# Altium PCB HFPB_01-PCB.PcbDoc (part 4 of 5)
Units mm, origin at the board's own origin, x right, y up, seen from the top; angles counter-clockwise.
Board outline 125 x 200 mm, 8 copper layers (Top Layer, Signal Layer 1, Signal Layer 2, Signal Layer 3, Signal Layer 4, Signal Layer 5, Signal Layer 6, Bottom Layer), stack 1.53 mm thick; 382 components, 179 nets, 1080 pads, 272 vias.
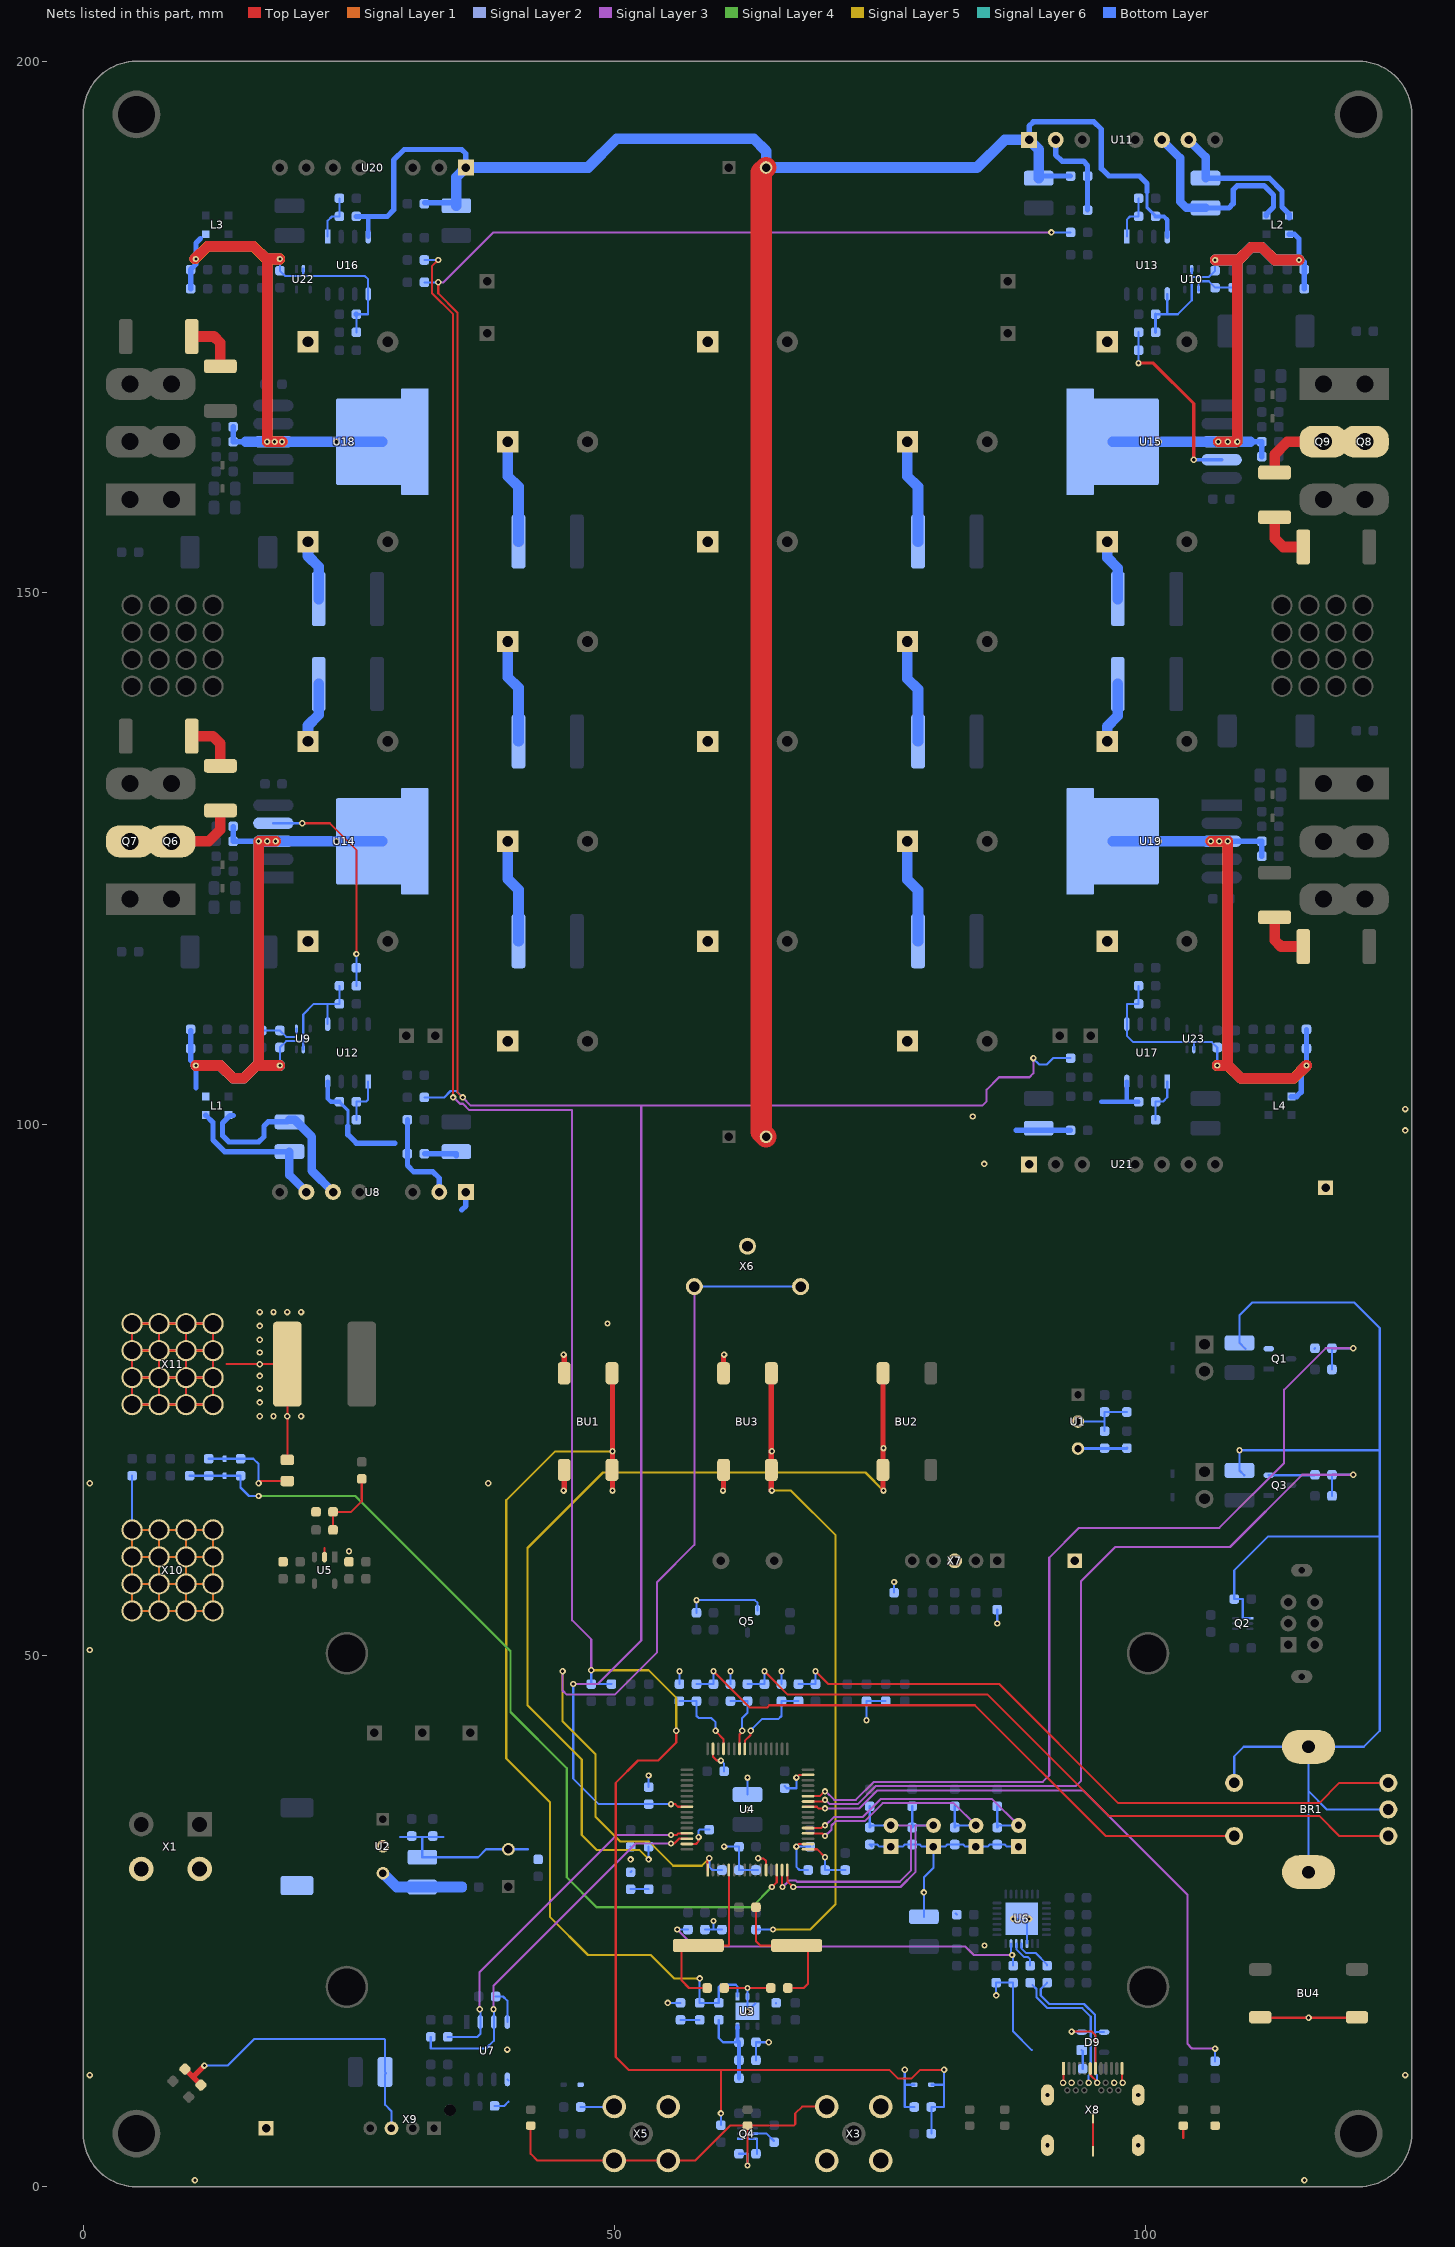
[diagram p9: the nets of this part, all layers, seen from the top]

## Via types
v1: diameter 0.6, hole 0.3, Top Layer to Bottom Layer, tented both sides, 272 vias

## Nets (pads, with @x,y where several pads share a name; then routed paths per layer and width w, separated by ;. In a path a pad name is that pad's centre, name@x,y a point inside that pad or via, vN(x,y) a via of type N, cw(c..) or ccw(c..) an arc to the next point about the centre after c; other vN are vias at no path point) (continued)
+HV: C50.P C51.P C52.P C53.P C54.P C55.P C56.P C57.P C58.P C59.P C60.P C61.P C62.P C63.P C64.P C65.P C66.P C67.P C68.P C69.P C70.1 C71.1 C72.1 C73.1 C74.1 C75.1 C76.1 C77.1 C78.1 C79.1 C96.1 C97.1 Q6.2 Q7.2 Q8.2 Q9.2 R1.2 X10.1 | length 466.9
  Top Layer w1: Q6.2@8.3,126.6 11.8,126.6 12.9,127.7 C96.1@12.9,129.5 ; C97.1@112.1,161.3 112.1,163 113.3,164.2 116,164.2 Q9.2@116.7,163.5
  Signal Layer 3 w0.2: X10.1@4.58,54.2 X10.1@4.58,61.82 ; X10.1@4.59,54.19 X10.1@12.21,54.19 ; X10.1@4.59,56.73 X10.1@7.12,56.73 ; X10.1@4.59,59.27 X10.1@7.12,59.27 ; X10.1@4.59,61.81 X10.1@7.12,61.81 ; X10.1@7.12,54.2 X10.1@7.12,56.73 ; X10.1@7.12,61.82 X10.1@7.12,61.81 ; X10.1@9.66,54.2 X10.1@9.66,56.73 ; X10.1@9.66,61.82 X10.1@9.66,61.81 ; X10.1@12.2,54.2 X10.1@12.2,56.73 ; X10.1@12.2,61.82 X10.1@12.2,61.81 ; X10.1@12.21,56.73 X10.1@12.2,56.73 ; X10.1@12.21,59.27 X10.1@12.2,59.27 ; X10.1@12.21,61.81 X10.1@12.2,61.81 ; X10.1@7.12,56.73 X10.1@9.66,56.73 ; X10.1@7.12,56.73 X10.1@7.12,59.27 ; X10.1@7.12,59.27 X10.1@9.66,59.27 ; X10.1@7.12,59.27 X10.1@7.12,61.81 ; X10.1@7.12,61.81 X10.1@9.66,61.81 ; X10.1@9.66,56.73 X10.1@12.2,56.73 ; X10.1@9.66,56.73 X10.1@9.66,59.27 ; X10.1@9.66,59.27 X10.1@9.66,61.81 ; X10.1@9.66,59.27 X10.1@12.2,59.27 ; X10.1@9.66,61.81 X10.1@12.2,61.81 ; X10.1@12.2,56.73 X10.1@12.2,59.27 ; X10.1@12.2,59.27 X10.1@12.2,61.81
  Signal Layer 4 w0.2: X10.1@4.59,54.19 X10.1@4.59,61.81 ; X10.1@4.6,54.18 X10.1@12.22,54.18 ; X10.1@4.6,56.72 X10.1@7.13,56.72 ; X10.1@4.6,59.26 X10.1@7.13,59.26 ; X10.1@4.6,61.8 X10.1@7.13,61.8 ; X10.1@7.13,54.19 X10.1@7.13,56.72 ; X10.1@7.13,61.81 X10.1@7.13,61.8 ; X10.1@9.67,54.19 X10.1@9.67,56.72 ; X10.1@9.67,61.81 X10.1@9.67,61.8 ; X10.1@12.21,54.19 X10.1@12.21,56.72 ; X10.1@12.21,61.81 X10.1@12.21,61.8 ; X10.1@12.22,56.72 X10.1@12.21,56.72 ; X10.1@12.22,59.26 X10.1@12.21,59.26 ; X10.1@12.22,61.8 X10.1@12.21,61.8 ; X10.1@7.13,56.72 X10.1@9.67,56.72 ; X10.1@7.13,56.72 X10.1@7.13,59.26 ; X10.1@7.13,59.26 X10.1@9.67,59.26 ; X10.1@7.13,59.26 X10.1@7.13,61.8 ; X10.1@7.13,61.8 X10.1@9.67,61.8 ; X10.1@9.67,56.72 X10.1@9.67,59.26 ; X10.1@9.67,56.72 X10.1@12.21,56.72 ; X10.1@9.67,59.26 X10.1@9.67,61.8 ; X10.1@9.67,59.26 X10.1@12.21,59.26 ; X10.1@9.67,61.8 X10.1@12.21,61.8 ; X10.1@12.21,56.72 X10.1@12.21,59.26 ; X10.1@12.21,59.26 X10.1@12.21,61.8
  Signal Layer 1 w0.2: X10.1@4.59,56.73 X10.1@4.59,59.27 ; X10.1@4.59,56.73 X10.1@7.13,56.73 ; X10.1@4.59,56.73 X10.1@4.59,54.19 X10.1@7.13,54.19 ; X10.1@4.59,59.27 X10.1@7.13,59.27 ; X10.1@4.59,59.27 X10.1@4.59,61.81 X10.1@7.13,61.81 ; X10.1@7.13,54.19 X10.1@7.13,56.73 ; X10.1@7.13,54.19 X10.1@9.67,54.19 ; X10.1@7.13,56.73 X10.1@7.13,59.27 ; X10.1@7.13,56.73 X10.1@9.67,56.73 ; X10.1@7.13,59.27 X10.1@7.13,61.81 ; X10.1@7.13,59.27 X10.1@9.67,59.27 ; X10.1@7.13,61.81 X10.1@9.67,61.81 ; X10.1@9.67,54.19 X10.1@9.67,56.73 ; X10.1@9.67,54.19 X10.1@12.21,54.19 X10.1@12.21,56.73 ; X10.1@9.67,56.73 X10.1@9.67,59.27 ; X10.1@9.67,56.73 X10.1@12.21,56.73 ; X10.1@9.67,59.27 X10.1@9.67,61.81 ; X10.1@9.67,59.27 X10.1@12.21,59.27 ; X10.1@9.67,61.81 X10.1@12.21,61.81 X10.1@12.21,59.27 ; X10.1@12.21,56.73 X10.1@12.21,59.27
  Signal Layer 2 w0.2: X10.1@4.58,54.2 X10.1@4.58,61.82 ; X10.1@4.59,54.19 X10.1@12.21,54.19 ; X10.1@4.59,56.73 X10.1@7.12,56.73 ; X10.1@4.59,59.27 X10.1@7.12,59.27 ; X10.1@4.59,61.81 X10.1@7.12,61.81 ; X10.1@7.12,54.2 X10.1@7.12,56.73 ; X10.1@7.12,61.82 X10.1@7.12,61.81 ; X10.1@9.66,54.2 X10.1@9.66,56.73 ; X10.1@9.66,61.82 X10.1@9.66,61.81 ; X10.1@12.2,54.2 X10.1@12.2,56.73 ; X10.1@12.2,61.82 X10.1@12.2,61.81 ; X10.1@12.21,56.73 X10.1@12.2,56.73 ; X10.1@12.21,59.27 X10.1@12.2,59.27 ; X10.1@12.21,61.81 X10.1@12.2,61.81 ; X10.1@7.12,56.73 X10.1@9.66,56.73 ; X10.1@7.12,56.73 X10.1@7.12,59.27 ; X10.1@7.12,59.27 X10.1@9.66,59.27 ; X10.1@7.12,59.27 X10.1@7.12,61.81 ; X10.1@7.12,61.81 X10.1@9.66,61.81 ; X10.1@9.66,56.73 X10.1@9.66,59.27 ; X10.1@9.66,56.73 X10.1@12.2,56.73 ; X10.1@9.66,59.27 X10.1@12.2,59.27 ; X10.1@9.66,59.27 X10.1@9.66,61.81 ; X10.1@9.66,61.81 X10.1@12.2,61.81 ; X10.1@12.2,56.73 X10.1@12.2,59.27 ; X10.1@12.2,59.27 X10.1@12.2,61.81
  Signal Layer 5 w0.2: X10.1@4.58,54.2 X10.1@4.58,61.82 ; X10.1@4.59,54.19 X10.1@12.21,54.19 ; X10.1@4.59,56.73 X10.1@7.12,56.73 ; X10.1@4.59,59.27 X10.1@7.12,59.27 ; X10.1@4.59,61.81 X10.1@7.12,61.81 ; X10.1@7.12,54.2 X10.1@7.12,56.73 ; X10.1@7.12,61.82 X10.1@7.12,61.81 ; X10.1@9.66,54.2 X10.1@9.66,56.73 ; X10.1@9.66,61.82 X10.1@9.66,61.81 ; X10.1@12.2,54.2 X10.1@12.2,56.73 ; X10.1@12.2,61.82 X10.1@12.2,61.81 ; X10.1@12.21,56.73 X10.1@12.2,56.73 ; X10.1@12.21,59.27 X10.1@12.2,59.27 ; X10.1@12.21,61.81 X10.1@12.2,61.81 ; X10.1@7.12,56.73 X10.1@9.66,56.73 ; X10.1@7.12,56.73 X10.1@7.12,59.27 ; X10.1@7.12,59.27 X10.1@9.66,59.27 ; X10.1@7.12,59.27 X10.1@7.12,61.81 ; X10.1@7.12,61.81 X10.1@9.66,61.81 ; X10.1@9.66,56.73 X10.1@12.2,56.73 ; X10.1@9.66,56.73 X10.1@9.66,59.27 ; X10.1@9.66,59.27 X10.1@12.2,59.27 ; X10.1@9.66,59.27 X10.1@9.66,61.81 ; X10.1@9.66,61.81 X10.1@12.2,61.81 ; X10.1@12.2,56.73 X10.1@12.2,59.27 ; X10.1@12.2,59.27 X10.1@12.2,61.81
  Signal Layer 6 w0.2: X10.1@4.58,54.2 X10.1@4.58,61.82 ; X10.1@4.59,54.19 X10.1@12.21,54.19 ; X10.1@4.59,56.73 X10.1@7.12,56.73 ; X10.1@4.59,59.27 X10.1@7.12,59.27 ; X10.1@4.59,61.81 X10.1@7.12,61.81 ; X10.1@7.12,54.2 X10.1@7.12,56.73 ; X10.1@7.12,61.82 X10.1@7.12,61.81 ; X10.1@9.66,54.2 X10.1@9.66,56.73 ; X10.1@9.66,61.82 X10.1@9.66,61.81 ; X10.1@12.2,54.2 X10.1@12.2,56.73 ; X10.1@12.2,61.82 X10.1@12.2,61.81 ; X10.1@12.21,56.73 X10.1@12.2,56.73 ; X10.1@12.21,59.27 X10.1@12.2,59.27 ; X10.1@12.21,61.81 X10.1@12.2,61.81 ; X10.1@7.12,56.73 X10.1@9.66,56.73 ; X10.1@7.12,56.73 X10.1@7.12,59.27 ; X10.1@7.12,59.27 X10.1@9.66,59.27 ; X10.1@7.12,59.27 X10.1@7.12,61.81 ; X10.1@7.12,61.81 X10.1@9.66,61.81 ; X10.1@9.66,56.73 X10.1@9.66,59.27 ; X10.1@9.66,56.73 X10.1@12.2,56.73 ; X10.1@9.66,59.27 X10.1@9.66,61.81 ; X10.1@9.66,59.27 X10.1@12.2,59.27 ; X10.1@9.66,61.81 X10.1@12.2,61.81 ; X10.1@12.2,56.73 X10.1@12.2,59.27 ; X10.1@12.2,59.27 X10.1@12.2,61.81
  Bottom Layer w0.2: X10.1@4.59,61.81 4.6,61.82 R1.2@4.6,66.9
  Bottom Layer w1: C52.P@21.15,136 21.15,137.5 22.15,138.5 C78.1@22.15,141.4 ; C51.P@21.15,154.8 21.15,153.45 22.15,152.45 C79.1@22.15,149.4 ; C56.P@39.95,126.6 39.95,123.05 40.95,122.05 C75.1@40.95,117.2 ; C55.P@39.95,145.4 39.95,142.05 40.95,141.05 C76.1@40.95,136 ; C54.P@39.95,164.2 39.95,160.95 40.95,159.95 C77.1@40.95,154.8 ; C64.P@77.55,126.6 77.55,123 78.55,122 C72.1@78.55,117.2 ; C63.P@77.55,145.4 77.55,141.9 78.55,140.9 C73.1@78.55,136 ; C62.P@77.55,164.2 77.55,160.95 78.55,159.95 C74.1@78.55,154.8 ; C68.P@96.35,136 96.35,137.4 97.35,138.4 C70.1@97.35,141.4 ; C67.P@96.35,154.8 96.35,153.3 97.35,152.3 C71.1@97.35,149.4
+VBAT: C27.1 U4.1 X6.2 | length 89.5
  Top Layer w0.2: U4.1@58.75,29.8 58.75,30.75 v1(58.9,30.9)
  Signal Layer 3 w0.2: v1(45.1,48.5) 45.1,46.7 45.5,46.3 50,46.3 54,50.3 54,56.9 57.5,60.4 X6.2@57.5,84.7
  Signal Layer 5 w0.2: v1(45.1,48.5) 45.1,43.8 48.2,40.7 48.2,34.8 50.5,32.5 53.2,32.5 55.5,30.2 58.2,30.2 v1(58.9,30.9)
  Bottom Layer w0.2: X6.2@57.5,84.7 X6.2@67.5,84.7 ; v1(58.9,30.9) 58.9,30.1 59.2,29.8 C27.1@60.1,29.8
ADC_Current: C30.1 R43.1 U4.17 | length 5
  Top Layer w0.2: U4.17@68.2,31.75 69.05,31.75 v1(69.8,31)
  Bottom Layer w0.2: v1(69.8,31) C30.1@69.8,29.8 R43.1@71.7,29.8
ADC_HV: C13.1 D5.C R11.1 R14.2 U4.14 | length 84.2
  Top Layer w0.2: v1(64.8,28.2) 65.25,28.65 U4.14@65.25,29.8
  Signal Layer 4 w0.2: v1(16.5,65) 25.6,65 40.2,50.4 40.2,44.667 45.494,39.373 45.494,29.106 48.3,26.3 62.9,26.3 v1(64.8,28.2)
  Bottom Layer w0.2: R11.1@10,66.9 R14.2@11.8,66.9 D5.C@13.3,66.9 C13.1@14.8,66.9 14.8,65.8 15.6,65 v1(16.5,65)
ADC_NTC1: C19.1 R22.1 RT2.2 U4.15 | length 24.7
  Top Layer w0.2: U4.15@65.75,29.8 65.75,28.25 v1(65.8,28.2)
  Signal Layer 3 w0.2: v1(65.8,28.2) 66.4,28.8 67.049,28.8 67.149,28.7 76.834,28.7 77.9,29.766 77.9,34 RT2.2@76,34
  Bottom Layer w0.2: R22.1@74,35.8 C19.1@74,33.8 74.2,34 RT2.2@76,34
ADC_NTC2: C7.1 R2.1 RT1.2 U4.16 | length 24.1
  Top Layer w0.2: U4.16@66.25,29.8 66.25,28.75 v1(66.8,28.2)
  Signal Layer 3 w0.2: v1(66.8,28.2) 76.9,28.2 78.3,29.6 78.3,34 RT1.2@80,34
  Bottom Layer w0.2: R2.1@78,35.8 C7.1@78,33.8 78.2,34 RT1.2@80,34
ADC_NTC3: C43.1 R75.1 RT4.2 U4.20 | length 22.4
  Top Layer w0.2: U4.20@68.2,33.25 69.55,33.25 v1(69.8,33)
  Signal Layer 3 w0.2: v1(69.8,33) 70.4,33.6 70.4,33.986 70.814,34.4 73.531,34.4 75.231,36.1 81.9,36.1 RT4.2@84,34
  Bottom Layer w0.2: R75.1@82,35.8 C43.1@82,33.8 82.2,34 RT4.2@84,34
ADC_NTC4: C45.1 R74.1 RT3.2 U4.21 | length 26.1
  Top Layer w0.2: U4.21@68.2,33.75 69.45,33.75 69.7,34 v1(69.8,34)
  Signal Layer 3 w0.2: v1(69.8,34) 69.848,34 70.649,34.8 73.366,34.8 75.066,36.5 85.5,36.5 RT3.2@88,34
  Bottom Layer w0.2: R74.1@86,35.8 C45.1@86,33.8 86.2,34 RT3.2@88,34
Current_Sense: C124.1 R45.2 R117.2 | length 6.9
  Top Layer w0.2: R45.2@23.5,61.8 C124.1@23.5,63.5 25.2,63.5 26.2,64.5 R117.2@26.2,66.6
DANGER: R52.1 U4.25 | length 58.8
  Top Layer w0.2: U4.25@68,35.75 U4.25@68.2,35.75 69.016,35.75 69.166,35.6 v1(69.8,35.6)
  Signal Layer 3 w0.2: v1(69.8,35.6) 73.034,35.6 74.734,37.3 94.066,37.3 103.9,27.466 103.9,13.449 104.1,13.249 104.1,13.223 104.323,13 v1(106.5,13)
  Bottom Layer w0.2: R52.1@106.5,11.8 v1(106.5,13)
DP1_N: D9.2 R73.1 X8.A7 X8.B7 | length 20.9
  Top Layer w0.2: v1(93,14.6) 94.9,14.6 95.25,14.25 X8.A7@95.25,11.13
  Bottom Layer w0.2: R73.1@89.305,18.995 89.7,18.6 89.7,17.834 90.734,16.8 94,16.8 94.8,16 94.8,14.55 ; v1(93,14.6) 93,14.5 93.05,14.55 D9.2@93.945,14.55 94.8,14.55 ; X8.B7@94.6,9.78 94.6,10.46 94.8,10.66 94.8,14.55
DP1_P: D9.3 R67.1 X8.A6 X8.B6 | length 16.5
  Top Layer w0.2: X8.A6@94.75,11.13 94.75,10.514 95.4,9.864 X8.B6@95.4,9.78
  Bottom Layer w0.2: R67.1@90.7,19.2 90.1,18.6 90.1,18 90.9,17.2 94.166,17.2 95.2,16.166 95.2,14.55 ; X8.B6@95.25,9.93 X8.B6@95.4,9.78 95.4,10.46 95.2,10.66 95.2,14.55 ; D9.3@96.055,14.55 95.2,14.55
DP2_N: R73.2 U6.5 | length 2.8
  Bottom Layer w0.2: U6.5@87.8,22.875 87.8,22.334 88.534,21.6 88.9,21.6 89.1,21.4 R73.2@89.1,20.8
DP2_P: R67.2 U6.4 | length 3.6
  Bottom Layer w0.2: U6.4@88.3,22.875 88.3,22.4 88.7,22 89.6,22 90.7,20.9 R67.2@90.7,20.8
ENABLE: R55.1 R91.1 R92.1 R105.1 R106.1 U4.56 | length 285
  Top Layer w0.2: v1(33.4,179.2) 33.4,178.166 35.2,176.366 35.2,103 v1(35.7,102.5) ; v1(55.3,36) 55.7,36 55.95,35.75 U4.56@56.8,35.75
  Signal Layer 3 w0.2: v1(33.4,179.2) 33.9,179.2 38.6,183.9 v1(91.1,183.9) ; v1(35.7,102.5) 36.475,101.725 84.584,101.725 85,102.141 85,103.228 86.172,104.4 89.034,104.4 89.4,104.766 v1(89.4,106.2) ; v1(46.1,47.3) 48.4,47.3 52.5,51.4 52.5,101.7
  Bottom Layer w0.2: R91.1@32.1,102.5 33.951,102.5 34.551,103.1 35.049,103.1 35.1,103.1 v1(35.7,102.5) ; R105.1@32.1,179.2 v1(33.4,179.2) ; v1(46.1,47.3) 46.1,38.4 48.5,36 R55.1@53.2,36 v1(55.3,36) ; v1(89.4,106.2) 89.4,106.151 89.951,105.6 90.649,105.6 91.249,106.2 R106.1@92.9,106.2 ; v1(91.1,183.9) R92.1@92.9,183.9
Enc_A: C49.1 R83.2 U4.42 | length 6.4
  Top Layer w0.2: U4.42@61.75,41.2 61.75,42.55 62,42.8 v1(62,42.9)
  Bottom Layer w0.2: C49.1@60.9,45.7 R83.2@62.5,45.7 62.5,44.6 62,44.1 v1(62,42.9)
Enc_B: C48.1 R81.2 U4.41 | length 8.5
  Top Layer w0.2: U4.41@62.25,41.2 62.25,41.95 62.8,42.5 v1(62.8,42.9)
  Bottom Layer w0.2: v1(62.8,42.9) 62.9,42.9 63,43 63,43.149 63.851,44 65.4,44 65.7,44.3 C48.1@65.7,45.7 R81.2@67.3,45.7
Enc_switch: C47.1 R79.2 U4.45 | length 7.9
  Top Layer w0.2: v1(59.5,42.9) 59.5,42.851 60.25,42.101 U4.45@60.25,41.2
  Bottom Layer w0.2: C47.1@56.1,45.7 R79.2@57.7,45.7 57.7,44.3 57.9,44.1 59.1,44.1 59.5,43.7 v1(59.5,42.9)
FAN-ON-1: R8.1 R13.2 U4.27 | length 89.5
  Top Layer w0.2: U4.27@68.2,36.75 69.301,36.75 69.751,37.2 v1(69.8,37.2)
  Signal Layer 3 w0.2: v1(69.8,37.2) 69.849,37.2 70.649,36.4 72.703,36.4 74.403,38.1 90.3,38.1 90.9,38.7 90.9,59.2 93.7,62 106.9,62 113,68.1 113,75 116.9,78.9 v1(119.5,78.9)
  Bottom Layer w0.2: R8.1@117.5,76.9 R13.2@117.5,78.9 v1(119.5,78.9)
FAN-ON-2: R21.1 R28.2 U4.26 | length 79.4
  Top Layer w0.2: U4.26@68.2,36.25 69.65,36.25 v1(69.8,36.4)
  Signal Layer 3 w0.2: v1(69.8,36.4) 69.849,36.4 70.249,36 72.869,36 74.569,37.7 93.4,37.7 93.9,38.2 93.9,57 97.1,60.2 107.9,60.2 114.7,67 v1(119.5,67)
  Bottom Layer w0.2: R21.1@117.5,65 R28.2@117.5,67 v1(119.5,67)
Gen_Work: D6.C R9.1 R10.2 R12.1 R15.2 R16.1 R39.1 | length 241.5
  Top Layer w0.2: v1(33.4,181.3) 32.8,180.7 32.8,178.2 34.8,176.2 v1(34.8,102.5) ; v1(55.8,42.9) 55.8,41.8 54.1,40.1 52.2,40.1 50.1,38 50.1,12.2 51.3,11 60,11 ; v1(60,6.9) 60,11 ; v1(81,11) 78.749,11 77.949,10.2 76.651,10.2 75.851,11 60,11
  Signal Layer 3 w0.2: v1(34.8,102.5) 34.851,102.5 35.451,101.9 35.734,101.9 36.334,101.3 46,101.3 46,53.3 47.8,51.5 v1(47.8,48.6)
  Signal Layer 5 w0.2: v1(47.8,48.6) 53.2,48.6 55.8,46 v1(55.8,42.9)
  Bottom Layer w0.2: R12.1@32.1,181.3 v1(33.4,181.3) ; v1(47.8,48.6) R10.2@47.8,47.3 R9.1@49.7,47.3 ; R39.1@60,5.8 v1(60,6.9) ; R15.2@79.8,5 R16.1@79.8,7.5 81,7.5 81,9.6 ; D6.C@79.8,9.6 81,9.6 ; v1(81,11) 81,9.6
GND: BR1.0 BR1.C BR1.W BU1.1 BU1.2 BU3.1 BU3.2 BU4.1 BU4.2 C1.2 C2.2 C3.2 C4.2 C5.N C6.N C7.2 C8.2 C9.2 C10.2 C11.N C12.2 C13.2 C14.2 C15.2 C16.2 C17.2 C18.2 C19.2 C20.2 C21.2 C22.2 C23.2 C24.2 C25.2 C26.2 C27.2 C28.2 C29.2 C30.2 C31.2 C32.1 C33.2 C34.2 C35.2 C36.2 C37.1 C38.2 C39.1 C40.2 C41.2 C42.2 C43.2 C44.2 C45.2 C46.2 C47.2 C48.2 C49.2 C82.2 C85.2 C88.2 C91.2 C94.2 C95.2 C110.2 C111.2 C124.2 C127.2 C130.2 C131.2 C134.2 D2.A D5.A D6.A D8.A D9.1 LD1.C LD2.C LD3.C LD4.C Q1.2 Q2.1 Q3.2 Q4.1 Q5.2 R3.1 R13.1 R14.1 R16.2 R23.1 R28.1 R29.2 R35.2 R41.1 R44.1 R49.1 R54.1 R55.2 R62.2 R84.2 R121.1 RT1.1 RT2.1 RT3.1 RT4.1 TP4.1 TP5.1 TP6.1 U1.2 U2.2 U3.2 U3.EP U4.12 U4.18 U4.31 U4.47 U4.63 U5.2 U6.3 U6.EP U7.4 U7.5 U8.1 U11.1 U12.4 U13.4 U16.4 U17.4 U20.1 U21.1 X1.2 X1.4 X3.2 X5.2 X6.1 X7.3 X8.A1 X8.A12 X8.B1 X8.B12 X8.G1 X8.G2 X8.G3 X8.G4 X8.S1 X8.S2 X8.S3 X8.S4 X9.3 | length 600.9
  Top Layer w0.2: v1(16.5,66.2) 16.5,66.4 R121.1@19.2,66.4 ; C124.2@21.7,63.5 C124.2@21.9,63.7 ; U5.2@22.7,59.25 22.7,60.1 ; LD1.C@42.1,5.75 42.1,3.1 42.74,2.46 X5.2@49.96,2.46 X5.2@55.04,2.46 57.56,2.46 60.85,5.75 LD2.C@62.5,5.75 ; U4.63@56.8,32.25 57.65,32.25 57.9,32.5 v1(57.9,32.9) ; U4.47@59.25,41.2 59.25,40.45 59.6,40.1 v1(60,40.1) ; C41.2@60.3,18.7 C42.2@64.7,18.7 ; v1(62.5,2) LD2.C@62.5,5.75 ; v1(63.5,30.9) 64,30.9 64.25,30.65 U4.12@64.25,29.8 ; v1(67.1,32) 67.35,32.25 U4.18@68.2,32.25 ; v1(67.1,38.5) 67.149,38.5 67.399,38.75 U4.31@68.2,38.75 ; X3.2@69.96,7.54 67.64,7.54 67,6.9 67,5.9 66.85,5.75 LD2.C@62.5,5.75 ; X8.B12@92.2,9.78 92.25,9.83 X8.A1@92.25,11.13 ; X8.G4@95,3.35 X8.G3@95,6.45 ; X8.A12@97.75,11.13 97.75,9.83 X8.B1@97.8,9.78 ; 103.499,4.601 LD3.C@103.499,5.75 ; BU4.2@110.75,15.95 110.8,15.9 v1(115.3,15.9) 119.8,15.9 BU4.1@119.85,15.95
  Top Layer w0.5: R84.2@9.566,11.066 10.316,10.316 ; C44.2@11.066,9.566 10.316,10.316 ; v1(11.4,11.4) 10.316,10.316 ; v1(45.2,65.5) 45.25,65.55 BU1.1@45.25,67.45 ; v1(45.2,78.3) 45.25,78.25 BU1.2@45.25,76.55 ; v1(60.2,65.5) 60.25,65.55 BU3.1@60.25,67.45 ; BU3.2@60.25,76.55 60.25,78.25 v1(60.3,78.3)
  Top Layer w2: C6.N@64.25,98.8 63.8,99.25 63.8,189.55 C5.N@64.25,190
  Bottom Layer w0.2: v1(11.4,11.4) 13.6,11.4 16.1,13.9 28.3,13.9 28.4,13.8 C34.2@28.4,10.8 ; R14.1@11.8,68.5 D5.A@13.3,68.5 C13.2@14.8,68.5 16,68.5 16.5,68 v1(16.5,66.2) ; 26.8,185.4 26.805,185.395 ; C34.2@28.5,10.7 28.4,10.6 28.4,7.7 29,7.1 X9.3@29,5.5 ; 29.8,32.9 31.9,32.9 ; 33.9,32.9 31.9,32.9 ; C35.2@38.7,7.6 39.6,7.6 40,8 ; C36.2@38.8,17.9 39.5,17.9 39.905,17.495 U7.4@39.905,15.5 ; U7.5@39.905,10.1 U7.5@40,10.005 ; 41.85,31.75 C11.N@40,31.75 37.9,31.75 37.15,31 C10.2@31.9,31 31.9,32.9 ; R35.2@46.8,7.5 49.92,7.5 X5.2@49.96,7.54 ; C46.2@51.5,29.6 C46.2@51.6,29.7 ; R44.1@51.5,32 R44.1@51.6,31.9 ; R55.2@53.2,37.6 v1(53.2,38.7) ; v1(55,17.3) C20.2@56.2,17.3 ; C47.2@56.1,47.3 v1(56.1,48.5) ; R41.1@57.7,54 v1(57.7,55.2) 63.2,55.2 63.45,54.95 Q5.2@63.45,54.25 ; v1(57.9,32.9) 57.9,33.5 58,33.6 C23.2@58.9,33.6 ; C40.2@58.5,24.2 59.3,24.2 ; v1(59.3,25) 59.3,24.2 ; v1(60,40.1) 60.3,39.8 C22.2@60.3,39.1 ; C15.2@60.1,24.2 59.3,24.2 ; v1(60.3,32) C29.2@61.7,32 C27.2@61.7,29.8 C28.2@63.3,29.8 C28.2@63.5,29.8 ; C49.2@60.9,47.3 v1(60.9,48.5) ; Q4.1@61.6,4.5 Q4.1@61.825,4.5 ; C26.2@61.7,3.1 62.5,3.1 v1(62.5,2) ; v1(62.5,18.7) U3.2@62.5,17.895 v1(62.5,16.5) 63.234,17.234 U3.EP@63.243,17.225 ; C25.2@62.5,36.9 v1(62.5,38.5) ; C16.2@63.3,11.9 C17.2@63.3,13.6 v1(64.5,13.6) ; C6.N@64.25,98.8 64.25,99.548 64.198,99.6 64.302,99.6 ; C18.2@65.2,17.225 C18.2@65.2,17.3 ; C48.2@65.7,47.3 v1(65.7,48.5) ; C21.2@66,37.7 66.2,37.5 67.1,37.5 v1(67.1,38.5) ; C30.2@68.2,29.8 67.4,29.8 67.1,30.1 v1(67.1,32) C24.2@68.4,32 ; v1(73.7,43.9) R23.1@73.7,45.7 R3.1@75.5,45.7 ; C19.2@74.2,32 C19.2@74,32.2 74.7,32.2 74.9,32 RT2.1@76,32 77.1,32 77.3,32.2 C7.2@78,32.2 78.7,32.2 78.9,32 RT1.1@80,32 ; C32.1@76.3,55.9 v1(76.3,56.9) ; v1(77.3,11) 77.3,9.6 ; R16.2@78.2,7.5 77.3,7.5 77.3,9.6 ; D6.A@78.2,9.6 77.3,9.6 ; C38.2@79.1,25.4 v1(79.1,27.7) 79.1,29.1 80,30 RT1.1@80,32 ; R62.2@82.1,25.7 R62.2@82.2,25.6 ; v1(85.9,18) C37.1@85.9,19.2 C39.1@87.5,19.2 87.5,14.6 89.25,12.85 ; v1(86,53) R54.1@86,54.3 ; v1(87.5,25.2) U6.EP@88.3,25.2 88.8,24.7 U6.3@88.8,22.875 ; RT3.1@88,32 86.9,32 86.7,32.2 C45.2@86,32.2 85.3,32.2 85.1,32 RT4.1@84,32 83,32 82.8,32.2 C43.2@82,32.2 81.3,32.2 81.1,32 RT1.1@80,32 ; U1.2@93.6,72 96.1,72 ; D9.1@93.945,12.85 94.05,12.745 C33.2@94.05,11.1 ; 95.8,102 95.8,102.1 ; C4.2@96.1,71.1 96.1,72 ; C2.2@98.2,72.9 C3.2@96.1,72.9 96.1,72 ; BR1.W@108.3,38 108.3,40.5 109.2,41.4 BR1.0@115.3,41.4 ; C14.2@109.25,66.95 C14.2@108.8,67.4 v1(108.8,69.3) 122,69.3 ; C1.2@109.35,78.85 C1.2@108.8,79.4 108.8,82 110,83.2 119.6,83.2 122,80.8 122,69.3 ; Q2.1@109.775,53.5 109.1,53.5 109.1,55.3 R29.2@108.3,55.3 108.3,58 111.5,61.2 122,61.2 ; Q3.2@111.55,66.95 115.85,66.95 R28.1@115.9,67 ; BR1.0@115.3,29.6 115.3,37.2 ; R13.1@115.85,78.85 R13.1@115.9,78.9 ; BR1.C@122.8,35.5 117,35.5 115.3,37.2 ; 115.3,37.2 BR1.0@115.3,41.4 ; BR1.0@115.3,41.4 120.5,41.4 122,42.9 122,61.2 ; 122,61.2 122,69.3
  Bottom Layer w0.3: C94.2@24.1,102.1 24.9,101.3 24.9,99.798 ; 100.1,187.702 100.1,186.2 C95.2@100.9,185.4
  Bottom Layer w0.4: U12.4@22.995,104 22.995,102.405 23.3,102.1 C94.2@24.1,102.1 ; U16.4@26.805,183.5 26.805,185.395 ; 95.8,102.1 98.195,102.1 ; U17.4@98.195,104 98.195,102.1 ; C111.2@99.3,102.1 98.195,102.1 ; C95.2@100.9,185.4 101.7,185.4 102.005,185.095 U13.4@102.005,183.5
  Bottom Layer w0.5: 24.9,99.798 24.9,99 25.7,98.2 29.3,98.2 ; C110.2@25.7,185.4 26.8,185.4 28.6,185.4 29.2,186 29.2,190.7 30.2,191.7 35.6,191.7 36,191.3 U20.1@36,190 ; C82.2@32.1,97.2 34.9,97.2 35.1,97 C88.2@35.1,97.2 ; C127.2@32.1,186.7 34.8,186.7 C131.2@35.1,186.4 ; 35.6,91.9 36,92.3 U8.1@36,93.6 ; 87.8,99.4 C130.2@92.9,99.4 ; U11.1@89,192.6 89,193.9 89.4,194.3 95.1,194.3 95.8,193.6 95.8,189.9 96.5,189.2 99.4,189.2 100.1,188.5 100.1,187.702 ; C91.2@89.9,189 90.1,189.2 C85.2@92.9,189.2
  Bottom Layer w1: C131.2@35.1,186.4 35.1,189.1 U20.1@36,190 47.5,190 50.2,192.7 63.1,192.7 64.25,191.55 C5.N@64.25,190 84.1,190 86.7,192.6 U11.1@89,192.6 89.9,191.7 C91.2@89.9,189
  other v1: 10.5,0.6 114.9,0.6 0.6,10.5 124.4,10.5 39.9,12.9 84.8,22.7 89,25.2 51.5,30.8 62.5,35.5 0.6,50.5 25,59.8 0.6,66.2 38.1,66.2 49.325,81.225 84.775,96.25 124.4,99.4 83.7,100.7 124.4,101.4
GND_1: C86.2 C89.2 C92.2 C98.2 C104.2 C105.2 L1.2 R87.1 U9.2 U12.5 U14.3 U14.EP | length 159
  Top Layer w1: v1(10.6,105.5) 12.903,105.5 14.103,104.3 15.097,104.3 16.5,105.703 v1(16.5,126.6) v1(18.1,126.6) ; 16.4,105.5 v1(18.5,105.5)
  Signal Layer 4 w1: v1(10.6,105.5) 12.903,105.5 14.103,104.3 15.097,104.3 16.5,105.703 v1(16.5,126.6) ; 16.4,105.5 v1(18.5,105.5)
  Signal Layer 2 w1: v1(10.6,105.5) 12.903,105.5 14.103,104.3 15.097,104.3 16.5,105.703 v1(16.5,126.6) v1(18.1,126.6) ; 16.4,105.5 v1(18.5,105.5)
  Signal Layer 6 w1: v1(10.6,105.5) 12.903,105.5 14.103,104.3 15.097,104.3 16.5,105.703 v1(16.5,126.6) v1(18.1,126.6) ; 16.4,105.5 v1(18.5,105.5)
  Bottom Layer w0.2: v1(18.5,105.5) C86.2@18.5,107.2 19.1,107.8 20.7,107.8 ; U9.2@20.7,107.025 20.7,107.8 ; U12.5@22.995,109.4 22.995,111.295 23,111.3 ; C98.2@24.1,113 C92.2@24.1,111.3 23,111.3 ; 20.7,107.8 20.7,110.3 21.7,111.3 23,111.3
  Bottom Layer w0.5: R87.1@10.1,108.8 C89.2@10.1,107.1 10.1,106 v1(10.6,105.5) 10.6,103.4 ; C105.2@14.1,128 C104.2@14.1,126.6 v1(16.5,126.6)
  Bottom Layer w1: v1(18.1,126.6) v1(23.8,126.6) U14.EP@28.13,126.6
  other v1: 17.307,126.6
GND_2: C108.2 C114.2 C120.2 C121.2 C132.2 C135.2 L3.3 R122.1 U16.5 U18.3 U18.EP U22.2 | length 145.6
  Top Layer w1: v1@10.514,181.414 11.7,182.6 16,182.6 17.3,181.3 v1(17.3,164.2) v1(18,164.2) v1(18.7,164.2) ; 17.3,181.4 v1(18.5,181.4)
  Signal Layer 3 w1: v1@10.514,181.414 11.7,182.6 16,182.6 17.3,181.3 v1(17.3,164.2) v1(18,164.2) v1(18.7,164.2) ; 17.3,181.4 v1(18.5,181.4)
  Signal Layer 1 w1: v1@10.514,181.414 11.7,182.6 16,182.6 17.3,181.3 v1(17.3,164.2) v1(18,164.2) v1(18.7,164.2) ; 17.3,181.4 v1(18.5,181.4)
  Signal Layer 5 w1: v1@10.514,181.414 11.7,182.6 16,182.6 17.3,181.3 v1(17.3,164.2) v1(18,164.2) v1(18.7,164.2) ; 17.3,181.4 v1(18.5,181.4)
  Bottom Layer w0.2: v1(18.5,181.4) C135.2@18.5,180.3 19,179.8 20.7,179.8 ; U22.2@20.7,180.2 20.7,179.8 ; U22.2@20.7,180.264 U22.2@20.7,180.475 ; C114.2@25.7,174.5 C108.2@25.7,176.2 26.805,176.2 U16.5@26.805,178.1 26.805,179.495 26.5,179.8 20.7,179.8
  Bottom Layer w0.5: R122.1@10.1,178.6 C132.2@10.1,180.4 10.6,180.9 v1(10.6,181.4) 10.6,182.9 11.025,183.325 ; C121.2@14.1,165.6 C120.2@14.1,164.2 15.3,164.2
  Bottom Layer w1: 15.3,164.2 v1(17.3,164.2) ; v1(18.7,164.2) v1(23.8,164.2) U18.EP@28.13,164.2
GND_3: C87.2 C90.2 C93.2 C99.2 C106.2 C107.2 L2.2 R88.1 U10.2 U13.5 U15.3 U15.EP | length 144.5
  Top Layer w1: v1(106.5,181.3) 108.703,181.3 109.903,182.5 110.9,182.5 112.1,181.3 v1(114.4,181.3) ; v1(106.8,164.2) v1(107.7,164.2) v1(108.6,164.2) 108.6,181.197
  Signal Layer 4 w1: v1(106.5,181.3) 108.703,181.3 109.903,182.5 110.9,182.5 112.1,181.3 v1(114.4,181.3) ; v1(106.8,164.2) v1(107.7,164.2) v1(108.6,164.2) 108.6,181.197
  Signal Layer 2 w1: v1(106.5,181.3) 108.703,181.3 109.903,182.5 110.9,182.5 112.1,181.3 v1(114.4,181.3) ; v1(106.8,164.2) v1(107.7,164.2) v1(108.6,164.2) 108.6,181.197
  Signal Layer 6 w1: v1(106.5,181.3) 108.703,181.3 109.903,182.5 110.9,182.5 112.1,181.3 v1(114.4,181.3) ; v1(106.8,164.2) v1(107.7,164.2) v1(108.6,164.2) 108.6,181.197
  Bottom Layer w0.2: C93.2@100.9,176.2 102.005,176.2 ; U13.5@102.005,178.1 102.005,176.2 ; U10.2@104.3,180.475 104.3,179.7 ; v1(106.5,181.3) C87.2@106.5,180.3 105.9,179.7 104.3,179.7 ; 102.005,176.2 103,176.2 104.3,177.5 104.3,179.7
  Bottom Layer w0.3: C99.2@100.9,174.5 C93.2@100.9,176.2
  Bottom Layer w0.5: 109.8,164.2 C106.2@110.9,164.2 C107.2@110.9,162.8 ; L2.2@113.475,183.725 113.975,183.725 114.4,183.3 v1(114.4,181.3) 114.7,181.3 114.9,181.1 C90.2@114.9,180.4 R88.1@114.9,178.6
  Bottom Layer w1: U15.EP@96.87,164.2 v1(106.8,164.2) ; v1(108.6,164.2) 109.8,164.2
  other v1: 101.2,164.2
GND_4: C109.2 C115.2 C122.2 C123.2 C133.2 C136.2 L4.3 R123.1 U17.5 U19.3 U19.EP U23.2 | length 166.6
  Top Layer w1: v1(106.1,126.6) v1(106.9,126.6) v1(107.7,126.6) 107.7,105.5 ; v1(106.7,105.5) 107.7,105.5 ; v1(115.1,105.5) 113.9,104.3 108.9,104.3 107.7,105.5
  Signal Layer 3 w1: v1(106.1,126.6) v1(106.9,126.6) v1(107.7,126.6) 107.7,105.5 ; v1(106.7,105.5) 107.7,105.5 ; v1(115.1,105.5) 113.9,104.3 108.9,104.3 107.7,105.5
  Signal Layer 1 w1: v1(106.1,126.6) v1(106.9,126.6) v1(107.7,126.6) 107.7,105.5 ; v1(106.7,105.5) 107.7,105.5 ; v1(115.1,105.5) 113.9,104.3 108.9,104.3 107.7,105.5
  Signal Layer 5 w1: v1(106.1,126.6) v1(106.9,126.6) v1(107.7,126.6) 107.7,105.5 ; v1(106.7,105.5) 107.7,105.5 ; v1(115.1,105.5) 113.9,104.3 108.9,104.3 107.7,105.5
  Bottom Layer w0.2: C115.2@99.3,113 C109.2@99.3,111.3 98.195,111.3 U17.5@98.195,109.4 98.195,108.305 98.8,107.7 104.5,107.7 ; U23.2@104.5,107.025 104.5,107.7 ; v1(106.7,105.5) C136.2@106.7,107.2 106.2,107.7 104.5,107.7
  Bottom Layer w0.5: v1(107.7,126.6) C123.2@110.9,126.6 C122.2@110.9,125.2 ; L4.3@113.675,102.575 114.175,102.575 114.6,103 114.6,105 v1(115.1,105.5) C133.2@115.1,107.1 R123.1@115.1,108.9
  Bottom Layer w1: U19.EP@96.87,126.6 v1(101.2,126.6) v1(106.1,126.6)
GND_HV: R118.1 R121.2 X11.1 | length 441.1
  Top Layer w0.2: X11.1@4.58,73.6 X11.1@4.58,81.22 ; X11.1@4.59,73.59 X11.1@12.21,73.59 ; X11.1@4.59,76.13 X11.1@7.12,76.13 ; X11.1@4.59,78.67 X11.1@7.12,78.67 ; X11.1@4.59,81.21 X11.1@7.12,81.21 ; X11.1@7.12,73.6 X11.1@7.12,76.13 ; X11.1@7.12,81.22 X11.1@7.12,81.21 ; X11.1@9.66,73.6 X11.1@9.66,76.13 ; X11.1@9.66,81.22 X11.1@9.66,81.21 ; X11.1@12.2,73.6 X11.1@12.2,76.13 ; X11.1@12.2,81.22 X11.1@12.2,81.21 ; X11.1@12.21,76.13 X11.1@12.2,76.13 ; X11.1@12.21,78.67 X11.1@12.2,78.67 ; X11.1@12.21,81.21 X11.1@12.2,81.21 ; 13.48,77.4 v1(16.6,77.4) R118.1@19.2,77.4 v1(19.2,72.5) R121.2@19.2,68.7 ; X11.1@7.12,76.13 X11.1@9.66,76.13 ; X11.1@7.12,76.13 X11.1@7.12,78.67 ; X11.1@7.12,78.67 X11.1@9.66,78.67 ; X11.1@7.12,78.67 X11.1@7.12,81.21 ; X11.1@7.12,81.21 X11.1@9.66,81.21 ; X11.1@9.66,76.13 X11.1@9.66,78.67 ; X11.1@9.66,76.13 X11.1@12.2,76.13 ; X11.1@9.66,78.67 X11.1@12.2,78.67 ; X11.1@9.66,78.67 X11.1@9.66,81.21 ; X11.1@9.66,81.21 X11.1@12.2,81.21 ; X11.1@12.2,76.13 X11.1@12.2,78.67 ; X11.1@12.2,78.67 X11.1@12.2,81.21
  Signal Layer 3 w0.2: X11.1@4.58,73.6 X11.1@4.58,81.22 ; X11.1@4.59,73.59 X11.1@12.21,73.59 ; X11.1@4.59,76.13 X11.1@7.12,76.13 ; X11.1@4.59,78.67 X11.1@7.12,78.67 ; X11.1@4.59,81.21 X11.1@7.12,81.21 ; X11.1@7.12,73.6 X11.1@7.12,76.13 ; X11.1@7.12,81.22 X11.1@7.12,81.21 ; X11.1@9.66,73.6 X11.1@9.66,76.13 ; X11.1@9.66,81.22 X11.1@9.66,81.21 ; X11.1@12.2,73.6 X11.1@12.2,76.13 ; X11.1@12.2,81.22 X11.1@12.2,81.21 ; X11.1@12.21,76.13 X11.1@12.2,76.13 ; X11.1@12.21,78.67 X11.1@12.2,78.67 ; X11.1@12.21,81.21 X11.1@12.2,81.21 ; X11.1@7.12,76.13 X11.1@7.12,78.67 ; X11.1@7.12,76.13 X11.1@9.66,76.13 ; X11.1@7.12,78.67 X11.1@9.66,78.67 ; X11.1@7.12,78.67 X11.1@7.12,81.21 ; X11.1@7.12,81.21 X11.1@9.66,81.21 ; X11.1@9.66,76.13 X11.1@12.2,76.13 ; X11.1@9.66,76.13 X11.1@9.66,78.67 ; X11.1@9.66,78.67 X11.1@9.66,81.21 ; X11.1@9.66,78.67 X11.1@12.2,78.67 ; X11.1@9.66,81.21 X11.1@12.2,81.21 ; X11.1@12.2,76.13 X11.1@12.2,78.67 ; X11.1@12.2,78.67 X11.1@12.2,81.21
  Signal Layer 4 w0.2: X11.1@4.58,73.6 X11.1@4.58,81.22 ; X11.1@4.59,73.59 X11.1@12.21,73.59 ; X11.1@4.59,76.13 X11.1@7.12,76.13 ; X11.1@4.59,78.67 X11.1@7.12,78.67 ; X11.1@4.59,81.21 X11.1@7.12,81.21 ; X11.1@7.12,73.6 X11.1@7.12,76.13 ; X11.1@7.12,81.22 X11.1@7.12,81.21 ; X11.1@9.66,73.6 X11.1@9.66,76.13 ; X11.1@9.66,81.22 X11.1@9.66,81.21 ; X11.1@12.2,73.6 X11.1@12.2,76.13 ; X11.1@12.2,81.22 X11.1@12.2,81.21 ; X11.1@12.21,76.13 X11.1@12.2,76.13 ; X11.1@12.21,78.67 X11.1@12.2,78.67 ; X11.1@12.21,81.21 X11.1@12.2,81.21 ; X11.1@7.12,76.13 X11.1@7.12,78.67 ; X11.1@7.12,76.13 X11.1@9.66,76.13 ; X11.1@7.12,78.67 X11.1@9.66,78.67 ; X11.1@7.12,78.67 X11.1@7.12,81.21 ; X11.1@7.12,81.21 X11.1@9.66,81.21 ; X11.1@9.66,76.13 X11.1@9.66,78.67 ; X11.1@9.66,76.13 X11.1@12.2,76.13 ; X11.1@9.66,78.67 X11.1@9.66,81.21 ; X11.1@9.66,78.67 X11.1@12.2,78.67 ; X11.1@9.66,81.21 X11.1@12.2,81.21 ; X11.1@12.2,76.13 X11.1@12.2,78.67 ; X11.1@12.2,78.67 X11.1@12.2,81.21
  Signal Layer 1 w0.2: X11.1@4.59,73.59 X11.1@4.59,81.21 ; X11.1@4.6,73.58 X11.1@12.22,73.58 ; X11.1@4.6,76.12 X11.1@7.13,76.12 ; X11.1@4.6,78.66 X11.1@7.13,78.66 ; X11.1@4.6,81.2 X11.1@7.13,81.2 ; X11.1@7.13,73.59 X11.1@7.13,76.12 ; X11.1@7.13,81.21 X11.1@7.13,81.2 ; X11.1@9.67,73.59 X11.1@9.67,76.12 ; X11.1@9.67,81.21 X11.1@9.67,81.2 ; X11.1@12.21,73.59 X11.1@12.21,76.12 ; X11.1@12.21,81.21 X11.1@12.21,81.2 ; X11.1@12.22,76.12 X11.1@12.21,76.12 ; X11.1@12.22,78.66 X11.1@12.21,78.66 ; X11.1@12.22,81.2 X11.1@12.21,81.2 ; X11.1@7.13,76.12 X11.1@9.67,76.12 ; X11.1@7.13,76.12 X11.1@7.13,78.66 ; X11.1@7.13,78.66 X11.1@7.13,81.2 ; X11.1@7.13,78.66 X11.1@9.67,78.66 ; X11.1@7.13,81.2 X11.1@9.67,81.2 ; X11.1@9.67,76.12 X11.1@12.21,76.12 ; X11.1@9.67,76.12 X11.1@9.67,78.66 ; X11.1@9.67,78.66 X11.1@12.21,78.66 ; X11.1@9.67,78.66 X11.1@9.67,81.2 ; X11.1@9.67,81.2 X11.1@12.21,81.2 ; X11.1@12.21,76.12 X11.1@12.21,78.66 ; X11.1@12.21,78.66 X11.1@12.21,81.2
  Signal Layer 2 w0.2: X11.1@4.58,73.6 X11.1@4.58,81.22 ; X11.1@4.59,73.59 X11.1@12.21,73.59 ; X11.1@4.59,76.13 X11.1@7.12,76.13 ; X11.1@4.59,78.67 X11.1@7.12,78.67 ; X11.1@4.59,81.21 X11.1@7.12,81.21 ; X11.1@7.12,73.6 X11.1@7.12,76.13 ; X11.1@7.12,81.22 X11.1@7.12,81.21 ; X11.1@9.66,73.6 X11.1@9.66,76.13 ; X11.1@9.66,81.22 X11.1@9.66,81.21 ; X11.1@12.2,73.6 X11.1@12.2,76.13 ; X11.1@12.2,81.22 X11.1@12.2,81.21 ; X11.1@12.21,76.13 X11.1@12.2,76.13 ; X11.1@12.21,78.67 X11.1@12.2,78.67 ; X11.1@12.21,81.21 X11.1@12.2,81.21 ; X11.1@7.12,76.13 X11.1@9.66,76.13 ; X11.1@7.12,76.13 X11.1@7.12,78.67 ; X11.1@7.12,78.67 X11.1@9.66,78.67 ; X11.1@7.12,78.67 X11.1@7.12,81.21 ; X11.1@7.12,81.21 X11.1@9.66,81.21 ; X11.1@9.66,76.13 X11.1@12.2,76.13 ; X11.1@9.66,76.13 X11.1@9.66,78.67 ; X11.1@9.66,78.67 X11.1@9.66,81.21 ; X11.1@9.66,78.67 X11.1@12.2,78.67 ; X11.1@9.66,81.21 X11.1@12.2,81.21 ; X11.1@12.2,76.13 X11.1@12.2,78.67 ; X11.1@12.2,78.67 X11.1@12.2,81.21
  Signal Layer 5 w0.2: X11.1@4.59,73.59 X11.1@4.59,81.21 ; X11.1@4.6,73.58 X11.1@12.22,73.58 ; X11.1@4.6,76.12 X11.1@7.13,76.12 ; X11.1@4.6,78.66 X11.1@7.13,78.66 ; X11.1@4.6,81.2 X11.1@7.13,81.2 ; X11.1@7.13,73.59 X11.1@7.13,76.12 ; X11.1@7.13,81.21 X11.1@7.13,81.2 ; X11.1@9.67,73.59 X11.1@9.67,76.12 ; X11.1@9.67,81.21 X11.1@9.67,81.2 ; X11.1@12.21,73.59 X11.1@12.21,76.12 ; X11.1@12.21,81.21 X11.1@12.21,81.2 ; X11.1@12.22,76.12 X11.1@12.21,76.12 ; X11.1@12.22,78.66 X11.1@12.21,78.66 ; X11.1@12.22,81.2 X11.1@12.21,81.2 ; X11.1@7.13,76.12 X11.1@9.67,76.12 ; X11.1@7.13,76.12 X11.1@7.13,78.66 ; X11.1@7.13,78.66 X11.1@9.67,78.66 ; X11.1@7.13,78.66 X11.1@7.13,81.2 ; X11.1@7.13,81.2 X11.1@9.67,81.2 ; X11.1@9.67,76.12 X11.1@12.21,76.12 ; X11.1@9.67,76.12 X11.1@9.67,78.66 ; X11.1@9.67,78.66 X11.1@12.21,78.66 ; X11.1@9.67,78.66 X11.1@9.67,81.2 ; X11.1@9.67,81.2 X11.1@12.21,81.2 ; X11.1@12.21,76.12 X11.1@12.21,78.66 ; X11.1@12.21,78.66 X11.1@12.21,81.2
  Signal Layer 6 w0.2: X11.1@4.59,73.59 X11.1@4.59,81.21 ; X11.1@4.6,73.58 X11.1@12.22,73.58 ; X11.1@4.6,76.12 X11.1@7.13,76.12 ; X11.1@4.6,78.66 X11.1@7.13,78.66 ; X11.1@4.6,81.2 X11.1@7.13,81.2 ; X11.1@7.13,73.59 X11.1@7.13,76.12 ; X11.1@7.13,81.21 X11.1@7.13,81.2 ; X11.1@9.67,73.59 X11.1@9.67,76.12 ; X11.1@9.67,81.21 X11.1@9.67,81.2 ; X11.1@12.21,73.59 X11.1@12.21,76.12 ; X11.1@12.21,81.21 X11.1@12.21,81.2 ; X11.1@12.22,76.12 X11.1@12.21,76.12 ; X11.1@12.22,78.66 X11.1@12.21,78.66 ; X11.1@12.22,81.2 X11.1@12.21,81.2 ; X11.1@7.13,76.12 X11.1@9.67,76.12 ; X11.1@7.13,76.12 X11.1@7.13,78.66 ; X11.1@7.13,78.66 X11.1@7.13,81.2 ; X11.1@7.13,78.66 X11.1@9.67,78.66 ; X11.1@7.13,81.2 X11.1@9.67,81.2 ; X11.1@9.67,76.12 X11.1@12.21,76.12 ; X11.1@9.67,76.12 X11.1@9.67,78.66 ; X11.1@9.67,78.66 X11.1@12.21,78.66 ; X11.1@9.67,78.66 X11.1@9.67,81.2 ; X11.1@9.67,81.2 X11.1@12.21,81.2 ; X11.1@12.21,76.12 X11.1@12.21,78.66 ; X11.1@12.21,78.66 X11.1@12.21,81.2
  other v1: 16.6,72.5 17.9,72.5 20.5,72.5 16.6,73.8 16.6,75.1 16.6,76.3 16.6,78.5 16.6,79.7 16.6,81 16.6,82.3 17.9,82.3 19.2,82.3 20.5,82.3
I2C_SCL: R71.1 U4.61 U7.2 | length 34
  Top Layer w0.2: v1@55.3,33.2 v1(55.3,33.1) 55.834,33.1 55.984,33.25 U4.61@56.8,33.25
  Signal Layer 3 w0.2: v1(37.3,16.7) 37.3,20.2 50.2,33.1 v1(55.3,33.1)
  Bottom Layer w0.2: R71.1@34.3,14.1 37.1,14.1 37.365,14.365 U7.2@37.365,15.5 37.365,16.635 v1(37.3,16.7)
I2C_SDA: R72.1 U4.62 U7.3 | length 36.5
  Top Layer w0.2: v1(55.3,32.3) 55.6,32.3 56.05,32.75 U4.62@56.8,32.75
  Signal Layer 3 w0.2: v1(38.6,16.7) 38.6,18.9 52,32.3 v1(55.3,32.3)
  Bottom Layer w0.2: R72.1@32.7,14.1 32.7,13 37.9,13 38.635,13.735 U7.3@38.635,15.5 38.635,16.665 v1(38.6,16.7)
NetBR1_A: BR1.A R78.1 R83.1 | length 67.9
  Top Layer w0.2: v1(64.1,48.5) 66.3,46.3 85.1,46.3 96.5,34.9 116.3,34.9 118.2,33 BR1.A@122.8,33
  Bottom Layer w0.2: R83.1@62.5,47.3 R78.1@64.1,47.3 v1(64.1,48.5)
NetBR1_B: BR1.B R77.1 R81.1 | length 62.6
  Top Layer w0.2: v1(68.9,48.5) 70.1,47.3 86.2,47.3 97.4,36.1 116.3,36.1 118.2,38 BR1.B@122.8,38
  Bottom Layer w0.2: R81.1@67.3,47.3 R77.1@68.9,47.3 v1(68.9,48.5)
NetBR1_S: BR1.S R76.1 R79.1 | length 58.4
  Top Layer w0.2: v1(59.3,48.5) 62.7,45.1 64.349,45.1 64.549,45.3 83.9,45.3 96.2,33 BR1.S@108.3,33
  Bottom Layer w0.2: R79.1@57.7,47.3 R76.1@59.3,47.3 v1(59.3,48.5)
NetBU1_3: BU1.3 BU1.4 R24.2 R25.1 U3.1 | length 92.5
  Top Layer w0.2: BU1.4@49.75,76.55 BU1.4@49.8,76.5
  Top Layer w0.5: v1(49.8,65.5) BU1.4@49.8,76.5
  Signal Layer 3 w0.2: v1(49.8,65.5) v1(49.8,69.2)
  Signal Layer 5 w0.2: v1(49.8,69.2) 44.4,69.2 39.8,64.6 39.8,40.3 43.9,36.2 43.9,25.4 47.5,21.8 53.4,21.8 55.6,19.6 v1(58,19.6)
  Bottom Layer w0.2: v1(58,19.6) R25.1@58,17.3 R24.2@59.8,17.3 59.8,18.8 60,19 61.4,19 61.55,18.85 U3.1@61.55,17.895
NetBU2_1: BU2.1 BU2.2 R40.2 | length 89.8
  Top Layer w0.5: BU2.2@75.25,76.55 BU2.1@75.25,67.45 75.25,65.55 v1(75.3,65.5)
  Signal Layer 3 w0.2: v1(75.3,65.5) v1(75.3,69.5)
  Signal Layer 5 w0.2: v1(53.2,30.8) 52.3,31.7 48.3,31.7 46.9,33.1 46.9,40.2 41.8,45.3 41.8,60.1 48.9,67.2 73.6,67.2 v1(75.3,65.5)
  Bottom Layer w0.2: v1(53.2,30.8) R40.2@53.2,32
NetBU3_3: BU3.3 BU3.4 R63.1 | length 65.7
  Top Layer w0.2: v1@64.75,65.55 v1(64.8,65.5)
  Top Layer w0.5: v1@64.75,65.55 BU3.3@64.75,67.45 64.75,69.15 v1(64.8,69.2) ; v1@64.75,69.2 BU3.4@64.75,76.55
  Signal Layer 3 w0.2: v1(64.8,65.5) v1@64.8,69.15
  Signal Layer 5 w0.2: v1(64.8,65.5) 66.6,65.5 70.8,61.3 70.8,26.6 68.4,24.2 v1(64.9,24.2)
  Bottom Layer w0.2: R63.1@63.3,24.2 v1(64.9,24.2)
NetC4_1: C4.1 FB1.2 U1.3 | length 4.6
  Bottom Layer w0.3: U1.3@93.6,69.46 98.16,69.46 FB1.2@98.2,69.5
NetC10_1: C10.1 FB2.2 U2.3 | length 7.9
  Bottom Layer w1: U2.3@28.2,29.5 29.5,28.2 C10.1@31.9,28.2 FB2.2@35.6,28.2
NetC16_1: C16.1 C17.1 FB3.1 R24.1 U3.6 | length 8.7
  Bottom Layer w0.2: R24.1@59.8,15.7 59.8,14 60.2,13.6 C17.1@61.7,13.6 C17.1@61.55,13.75
  Bottom Layer w0.4: C17.1@61.55,13.75 U3.6@61.55,15.105 ; FB3.1@61.7,10.2 C16.1@61.7,11.9 C17.1@61.7,13.6
NetC20_1: C20.1 R25.2 | length 1.8
  Bottom Layer w0.2: C20.1@56.2,15.7 R25.2@58,15.7
NetC26_1: C26.1 Q4.5 Q4.6 R34.2 | length 5.3
  Bottom Layer w0.2: Q4.6@63.175,4.5 62.5,4.5 62.5,5 Q4.5@63.175,5 ; Q4.5@63.2,5 64.3,5 R34.2@65,4.3 ; C26.1@63.4,3.1 Q4.6@63.4,4.5
NetC39_2: C39.2 R68.2 U6.6 | length 35.7
  Signal Layer 3 w0.2: v1(55.9,24.2) 57.5,22.6 83,22.6 83.8,21.8 v1(87.4,21.8)
  Bottom Layer w0.2: v1(55.9,24.2) R68.2@56.9,24.2 ; U6.6@87.3,22.875 87.3,21.9 v1(87.4,21.8) 87.5,21.7 C39.2@87.5,20.8
NetC41_1: C41.1 U4.5 Y1.1 | length 17.5
  Top Layer w0.2: C41.1@58.7,18.7 57,18.7 56.3,19.4 56.3,22.7 Y1.1@57.87,22.7 60.75,22.7 U4.5@60.75,29.8
NetC42_1: C42.1 R64.1 Y1.2 | length 13.9
  Top Layer w0.2: R64.1@63.3,26.3 63.3,23.1 63.7,22.7 Y1.2@67.13,22.7 68.2,22.7 68.2,19.1 67.8,18.7 C42.1@66.3,18.7
NetC46_1: C46.1 R82.2 | length 1.7
  Bottom Layer w0.2: C46.1@51.5,28 R82.2@53.2,28
NetC82_1: C82.1 FB6.2 U8.2 | length 9.1
  Bottom Layer w0.5: FB6.2@30.5,100.4 C82.1@30.5,97.2 30.5,96.1 31.1,95.5 32.9,95.5 33.5,94.9 U8.2@33.5,93.6
NetC83_1: C83.1 L1.4 U8.6 | length 19.3
  Bottom Layer w0.5: 14.1,100.8 13.8,100.8 13.1,100.1 13.1,98.9 13.7,98.3 16.5,98.3 17,98.8 17,99.8 17.4,100.2 19.2,100.2 C83.1@19.4,100.4
  Bottom Layer w0.8: C83.1@19.4,100.4 19.9,100.4 21.5,98.8 21.5,95.6 U8.6@23.5,93.6
NetC83_2: C83.2 L1.1 U8.7 | length 14.7
  Bottom Layer w0.5: L1.1@11.525,100.825 12.2,100.15 12.2,98.5 13.3,97.4 C83.2@19.4,97.4
  Bottom Layer w0.8: C83.2@19.4,97.4 19.4,95.2 U8.7@21,93.6
NetC84_1: C84.1 L2.4 U11.6 | length 19.8
  Bottom Layer w0.5: C84.1@105.6,186.2 107.8,186.2 108.2,186.6 108.2,187.9 108.6,188.3 111.11,188.3 112,187.41 112,186.3 111.325,185.625 L2.4@111.325,185.475
  Bottom Layer w0.8: U11.6@101.5,192.6 103.2,190.9 103.2,186.8 103.8,186.2 C84.1@105.6,186.2
NetC84_2: C84.2 L2.1 U11.7 | length 14.8
  Bottom Layer w0.5: C84.2@105.6,189 111.6,189 112.8,187.8 112.8,186.3 113.475,185.625 L2.1@113.475,185.475 L2.1@113.475,185.275
  Bottom Layer w0.8: U11.7@104,192.6 105.6,191 C84.2@105.6,189
NetC85_1: C85.1 FB9.2 U11.2 | length 9
  Bottom Layer w0.5: U11.2@91.5,192.6 91.5,191.2 92.1,190.6 94.1,190.6 94.5,190.2 C85.1@94.5,189.2 FB9.2@94.5,186
NetC86_1: C86.1 FB7.2 U9.4 | length 4.3
  Bottom Layer w0.2: FB7.2@16.8,108.8 C86.1@18.5,108.8 19.1,108.2 20.05,108.2 U9.4@20.05,108.975
NetC87_1: C87.1 FB8.2 U10.4 | length 4.3
  Bottom Layer w0.2: U10.4@105,178.475 104.95,178.425 U10.4@104.95,178.525 104.95,179.05 105.2,179.3 105.9,179.3 C87.1@106.5,178.7 FB8.2@108.2,178.7
NetC94_1: C94.1 FB10.2 U12.1 | length 4.6
  Bottom Layer w0.2: FB10.2@25.7,100.4 C94.1@25.7,102.1 26.6,102.1 26.805,102.305 U12.1@26.805,104
NetC95_1: C95.1 FB11.2 U13.1 | length 4.5
  Bottom Layer w0.2: U13.1@98.195,183.5 98.195,185.095 98.5,185.4 C95.1@99.3,185.4 FB11.2@99.3,187.1
NetC96_2: C96.2 R100.2 | length 5.1
  Top Layer w1: R100.2@10.2,136.5 12.2,136.5 12.9,135.8 C96.2@12.9,133.7
NetC97_2: C97.2 R101.2 | length 5
  Top Layer w1: C97.2@112.1,157.1 112.1,155.1 112.9,154.3 R101.2@114.8,154.3
NetC98_1: C98.1 R93.2 U14.4 | length 21.7
  Top Layer w0.2: v1(20.6,128.3) 23.2,128.3 25.7,125.8 v1(25.7,116)
  Bottom Layer w0.2: U14.4@17.88,128.302 20.598,128.302 v1(20.6,128.3) ; C98.1@25.7,113 v1(25.7,116)
NetC99_1: C99.1 R94.1 U15.4 | length 17.6
  Top Layer w0.3: v1(99.3,171.6) 100.7,171.6 104.5,167.8 v1(104.5,162.5)
  Bottom Layer w0.2: v1(99.3,171.6) R94.1@99.3,172.8 C99.1@99.3,174.5
  Bottom Layer w0.3: v1(104.5,162.5) 104.7,162.5 104.702,162.498 U15.4@107.12,162.498
NetC110_1: C110.1 FB12.2 U16.1 | length 4.5
  Bottom Layer w0.2: U16.1@22.995,183.5 22.995,184.995 23.4,185.4 C110.1@24.1,185.4 FB12.2@24.1,187.1
NetC111_1: C111.1 FB13.2 U17.1 | length 4.5
  Bottom Layer w0.2: FB13.2@100.9,100.4 C111.1@100.9,102.1 101.6,102.1 102.005,102.505 U17.1@102.005,104
NetC112_2: C112.2 R114.2 | length 4.5
  Top Layer w1: R114.2@10.8,174.1 12.3,174.1 12.9,173.5 C112.2@12.9,171.3
NetC113_2: C113.2 R115.2 | length 5.1
  Top Layer w1: C113.2@112.1,119.45 112.1,117.3 112.7,116.7 R115.2@114.8,116.7